# Altium PCB Alarm-Clock-v1.1.PcbDoc (part 4 of 4)
Units mm, origin at the board's own origin, x right, y up, seen from the top; angles counter-clockwise.
Board outline 56 x 73 mm, 2 copper layers (Top Layer, Bottom Layer), stack 1.448 mm thick; 146 components, 110 nets, 466 pads, 352 vias.
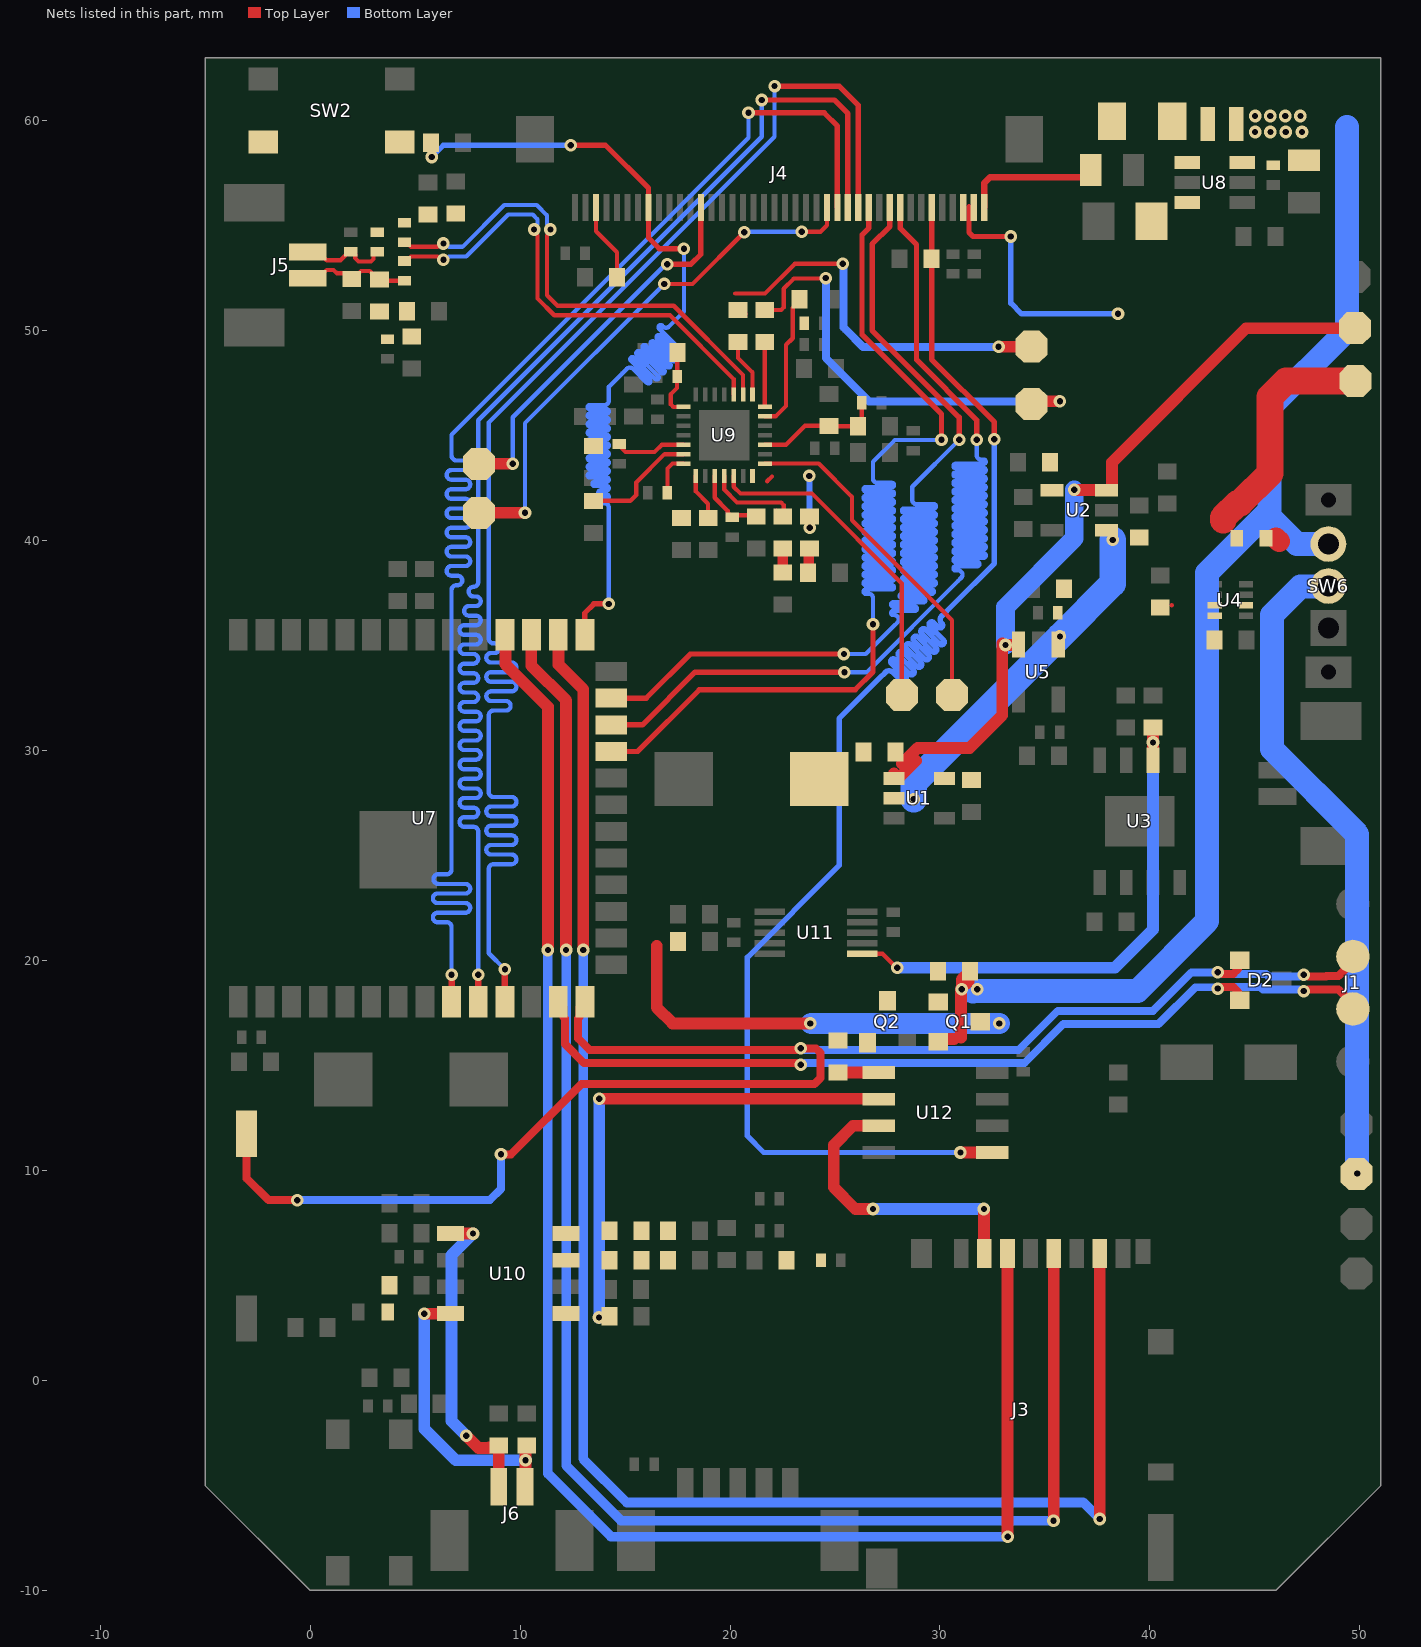
[diagram p3: the nets of this part, all layers, seen from the top]

## Via types
v1: diameter 0.6, hole 0.3, Top Layer to Bottom Layer, tented both sides, 187 vias
v2: diameter 0.6, hole 0.3, Top Layer to Bottom Layer, 165 vias

## Nets (pads, with @x,y where several pads share a name; then routed paths per layer and width w, separated by ;. In a path a pad name is that pad's centre, name@x,y a point inside that pad or via, vN(x,y) a via of type N, cw(c..) or ccw(c..) an arc to the next point about the centre after c; other vN are vias at no path point) (continued)
LCD_DB17: J4.33 R9.2 SW2.1 SW2.2 U7.27 | length 73.4
  Top Layer w0.254: v1(12.421,58.826) 14.072,58.826 16.115,56.783 J4.33@16.115,55.863 16.115,54.421 16.637,53.899 v1(17.805,53.899) ; U7.27@13.089,35.524 13.081,35.532 13.081,36.551 13.513,36.982 v1(14.224,36.982)
  Bottom Layer w0.203: v1(14.224,36.982) 14.224,41.478 14.224,41.58 ccw(c14.021,41.58) 14.021,41.783 13.843,41.783 cw(c13.843,41.885) 13.843,41.986 14.122,41.986 ccw(c14.122,42.088) 14.122,42.189 13.831,42.189 cw(c13.831,42.291) 13.831,42.393 14.122,42.393 ccw(c14.122,42.494) 14.122,42.596 13.552,42.596 cw(c13.552,42.697) 13.552,42.799 14.122,42.799 ccw(c14.122,42.901) 14.122,43.002 13.326,43.002 cw(c13.326,43.104) 13.326,43.205 14.122,43.205 ccw(c14.122,43.307) 14.122,43.409 13.326,43.409 cw(c13.326,43.51) 13.326,43.612 14.122,43.612 ccw(c14.122,43.713) 14.122,43.815 13.326,43.815 cw(c13.326,43.917) 13.326,44.018 14.122,44.018 ccw(c14.122,44.12) 14.122,44.221 13.326,44.221 cw(c13.326,44.323) 13.326,44.425 14.122,44.425 ccw(c14.122,44.526) 14.122,44.628 13.326,44.628 cw(c13.326,44.729) 13.326,44.831 14.122,44.831 ccw(c14.122,44.933) 14.122,45.034 13.326,45.034 cw(c13.326,45.136) 13.326,45.237 14.122,45.237 ccw(c14.122,45.339) 14.122,45.441 13.326,45.441 cw(c13.326,45.542) 13.326,45.644 14.122,45.644 ccw(c14.122,45.745) 14.122,45.847 13.326,45.847 cw(c13.326,45.949) 13.326,46.05 14.122,46.05 ccw(c14.122,46.152) 14.122,46.253 13.326,46.253 cw(c13.326,46.355) 13.326,46.457 14.021,46.457 ccw(c14.021,46.66) 14.224,46.66 14.224,47.066 14.224,47.32 14.872,47.968 15.087,48.183 cw(c15.231,48.04) 15.374,48.184 16.038,47.52 ; 16.039,47.519 ccw(c16.111,47.591) 16.183,47.519 ccw(c16.111,47.591) 16.183,47.663 15.282,48.564 cw(c15.354,48.635) 15.282,48.707 cw(c15.354,48.635) 15.426,48.707 16.431,47.701 ccw(c16.503,47.773) 16.575,47.701 ccw(c16.503,47.773) 16.575,47.845 15.569,48.851 cw(c15.641,48.923) 15.569,48.995 cw(c15.641,48.923) 15.713,48.995 16.719,47.989 ccw(c16.791,48.061) 16.862,47.989 ccw(c16.791,48.061) 16.862,48.132 15.857,49.138 cw(c15.928,49.21) 15.857,49.282 cw(c15.928,49.21) 16,49.282 17.006,48.276 ccw(c17.078,48.348) 17.15,48.276 ccw(c17.078,48.348) 17.15,48.42 16.248,49.321 ; 16.248,49.321 cw(c16.32,49.393) 16.248,49.465 cw(c16.32,49.393) 16.392,49.465 17.293,48.563 ccw(c17.365,48.635) 17.437,48.563 ccw(c17.365,48.635) 17.437,48.707 16.536,49.609 cw(c16.608,49.68) 16.536,49.752 cw(c16.608,49.68) 16.679,49.752 17.581,48.851 ccw(c17.653,48.923) 17.725,48.851 ccw(c17.653,48.923) 17.725,48.995 16.628,50.091 cw(c16.7,50.163) 16.628,50.235 cw(c16.7,50.163) 16.772,50.235 16.811,50.195 ccw(c16.955,50.339) 17.099,50.195 17.386,50.482 17.805,50.902 v1(17.805,53.899)
  Bottom Layer w0.254: v1(5.791,58.268) 6.35,58.826 v1(12.421,58.826)
LCD_DE: J4.13 U7.11 | length 76
  Top Layer w0.254: v1(22.123,61.646) 25.197,61.646 26.115,60.728 J4.13@26.115,55.863
  Top Layer w0.305: U7.11@9.279,18.024 v1(9.279,19.576)
  Bottom Layer w0.203: v1(9.279,19.576) 8.509,20.345 8.509,23.8 8.509,24.359 cw(c8.738,24.359) 8.738,24.587 9.599,24.587 ccw(c9.599,24.816) 9.599,25.044 8.618,25.044 cw(c8.618,25.273) 8.618,25.502 9.599,25.502 ccw(c9.599,25.73) 9.599,25.959 8.618,25.959 cw(c8.618,26.187) 8.618,26.416 9.599,26.416 ccw(c9.599,26.645) 9.599,26.873 8.618,26.873 cw(c8.618,27.102) 8.618,27.33 9.599,27.33 ccw(c9.599,27.559) 9.599,27.788 8.738,27.788 cw(c8.738,28.016) 8.509,28.016 8.509,31.674 cw(c8.738,31.674) 8.738,31.902 9.321,31.902 ccw(c9.321,32.131) 9.321,32.36 8.618,32.36 cw(c8.618,32.588) 8.618,32.817 9.599,32.817 ccw(c9.599,33.045) 9.599,33.274 8.618,33.274 cw(c8.618,33.503) 8.618,33.731 9.599,33.731 ccw(c9.599,33.96) 9.599,34.188 8.618,34.188 cw(c8.618,34.417) 8.618,34.646 8.787,34.646 ccw(c8.787,34.874) 8.787,35.103 8.738,35.103 cw(c8.738,35.331) 8.509,35.331 8.509,45.618 22.123,59.233 v1(22.123,61.646)
LCD_HSYNC: J4.15 U7.9 | length 76
  Top Layer w0.254: v1(20.879,60.376) 24.486,60.376 25.115,59.746 J4.15@25.115,55.863
  Top Layer w0.305: U7.9@6.739,18.024 v1(6.739,19.32)
  Bottom Layer w0.203: v1(6.739,19.32) 6.739,21.488 6.739,21.59 ccw(c6.51,21.59) 6.51,21.819 6.078,21.819 cw(c6.078,22.047) 6.078,22.276 7.399,22.276 ccw(c7.399,22.504) 7.399,22.733 6.078,22.733 cw(c6.078,22.962) 6.078,23.19 7.399,23.19 ccw(c7.399,23.419) 7.399,23.647 6.105,23.647 cw(c6.105,23.876) 6.105,24.105 6.51,24.105 ccw(c6.51,24.333) 6.739,24.333 6.739,25.451 6.739,37.084 6.739,37.643 cw(c6.967,37.643) 6.967,37.871 7.019,37.871 ccw(c7.019,38.1) 7.019,38.329 6.731,38.329 cw(c6.731,38.557) 6.731,38.786 7.399,38.786 ccw(c7.399,39.014) 7.399,39.243 6.731,39.243 cw(c6.731,39.472) 6.731,39.7 7.399,39.7 ccw(c7.399,39.929) 7.399,40.157 6.731,40.157 cw(c6.731,40.386) 6.731,40.615 7.399,40.615 ccw(c7.399,40.843) 7.399,41.072 6.731,41.072 cw(c6.731,41.3) 6.731,41.529 7.399,41.529 ccw(c7.399,41.758) 7.399,41.986 6.731,41.986 cw(c6.731,42.215) 6.731,42.443 7.399,42.443 ccw(c7.399,42.672) 7.399,42.901 6.731,42.901 cw(c6.731,43.129) 6.731,43.358 7.399,43.358 ccw(c7.399,43.586) 7.399,43.815 6.967,43.815 cw(c6.967,44.044) 6.739,44.044 6.739,44.755 6.739,45.042 20.879,59.182 v1(20.879,60.376)
LCD_PCLK: J4.12 U7.23 | length 75.6
  Top Layer w0.254: U7.23@14.339,29.954 15.603,29.954 18.542,32.893 25.959,32.893 26.81,33.744 v1(26.81,36.017) ; J4.12@26.615,55.863 26.615,54.885 26.289,54.559 26.289,49.809 30.074,46.025 v1(30.074,44.794)
  Bottom Layer w0.203: v1(26.81,36.017) 26.81,37.16 26.81,37.262 ccw(c26.607,37.262) 26.607,37.465 26.467,37.465 cw(c26.467,37.567) 26.467,37.668 27.708,37.668 ccw(c27.708,37.77) 27.708,37.871 26.467,37.871 cw(c26.467,37.973) 26.467,38.075 27.708,38.075 ccw(c27.708,38.176) 27.708,38.278 26.467,38.278 cw(c26.467,38.379) 26.467,38.481 27.708,38.481 ccw(c27.708,38.583) 27.708,38.684 26.467,38.684 cw(c26.467,38.786) 26.467,38.887 27.708,38.887 ccw(c27.708,38.989) 27.708,39.091 26.467,39.091 cw(c26.467,39.192) 26.467,39.294 27.708,39.294 ccw(c27.708,39.395) 27.708,39.497 26.467,39.497 cw(c26.467,39.599) 26.467,39.7 27.708,39.7 ccw(c27.708,39.802) 27.708,39.903 26.467,39.903 cw(c26.467,40.005) 26.467,40.107 27.708,40.107 ccw(c27.708,40.208) 27.708,40.31 26.467,40.31 cw(c26.467,40.411) 26.467,40.513 27.708,40.513 ccw(c27.708,40.615) 27.708,40.716 26.467,40.716 cw(c26.467,40.818) 26.467,40.919 27.708,40.919 ccw(c27.708,41.021) 27.708,41.123 26.467,41.123 cw(c26.467,41.224) 26.467,41.326 27.708,41.326 ccw(c27.708,41.427) 27.708,41.529 26.467,41.529 cw(c26.467,41.631) 26.467,41.732 27.708,41.732 ccw(c27.708,41.834) 27.708,41.935 26.467,41.935 cw(c26.467,42.037) 26.467,42.139 27.708,42.139 ccw(c27.708,42.24) 27.708,42.342 26.467,42.342 cw(c26.467,42.443) 26.467,42.545 27.708,42.545 ccw(c27.708,42.647) 27.708,42.748 27.013,42.748 cw(c27.013,42.951) 26.81,42.951 26.81,43.332 26.81,43.752 27.852,44.794 v1(30.074,44.794)
LCD_RST: J4.6 R15.1 U12.5 | length 76
  Top Layer w0.254: J4.6@29.615,55.863 29.615,53.435 R15.1@29.604,53.424 29.604,48.628 32.588,45.644 v1(32.588,44.831)
  Top Layer w0.559: v1(30.976,10.854) U12.5@32.482,10.854
  Bottom Layer w0.254: v1(30.976,10.854) 21.608,10.854 20.823,11.638 20.823,20.147 25.197,24.521 25.197,31.521 27.127,33.452 27.397,33.721 cw(c27.576,33.542) 27.755,33.722 28.194,33.284 ccw(c28.283,33.373) 28.373,33.284 ccw(c28.283,33.373) 28.373,33.463 27.688,34.148 cw(c27.778,34.238) 27.688,34.327 cw(c27.778,34.238) 27.868,34.327 28.553,33.643 ccw(c28.643,33.733) 28.732,33.643 ccw(c28.643,33.733) 28.732,33.822 28.048,34.507 cw(c28.138,34.597) 28.048,34.687 cw(c28.138,34.597) 28.227,34.687 28.912,34.002 ccw(c29.002,34.092) 29.092,34.002 ccw(c29.002,34.092) 29.092,34.182 28.407,34.866 cw(c28.497,34.956) 28.407,35.046 cw(c28.497,34.956) 28.587,35.046 29.271,34.361 ccw(c29.361,34.451) 29.451,34.361 ccw(c29.361,34.451) 29.451,34.541 28.766,35.225 cw(c28.856,35.315) 28.766,35.405 cw(c28.856,35.315) 28.946,35.405 29.63,34.72 ccw(c29.72,34.81) 29.81,34.72 ccw(c29.72,34.81) 29.81,34.9 29.125,35.585 cw(c29.215,35.674) 29.125,35.764 cw(c29.215,35.674) 29.305,35.764 29.99,35.08 ccw(c30.079,35.169) 30.169,35.08 ccw(c30.079,35.169) 30.169,35.259 29.518,35.911 cw(c29.607,36.001) 29.518,36.09 cw(c29.607,36.001) 29.697,36.09 29.911,35.876 ccw(c30.001,35.966) 30.091,35.876 ccw(c30.001,35.966) 30.091,36.056 cw(c30.27,36.236) 30.091,36.415 30.594,36.919 32.588,38.913 v1(32.588,44.831)
LCD_SCK: J4.10 U7.25 | length 76.1
  Top Layer w0.254: U7.25@14.339,32.494 16.01,32.494 18.11,34.595 v1(25.425,34.595) ; J4.10@27.615,55.863 27.615,54.96 26.772,54.117 26.772,50.009 30.912,45.869 v1(30.912,44.794)
  Bottom Layer w0.203: v1(25.425,34.595) 26.467,34.595 27.813,35.941 27.974,36.102 ccw(c27.83,36.246) 27.83,36.449 27.778,36.449 cw(c27.778,36.551) 27.778,36.652 28.798,36.652 ccw(c28.798,36.754) 28.798,36.855 27.778,36.855 cw(c27.778,36.957) 27.778,37.059 29.205,37.059 ccw(c29.205,37.16) 29.205,37.262 28.187,37.262 cw(c28.187,37.363) 28.187,37.465 29.611,37.465 ccw(c29.611,37.567) 29.611,37.668 28.292,37.668 cw(c28.292,37.77) 28.292,37.871 29.705,37.871 ccw(c29.705,37.973) 29.705,38.075 28.292,38.075 cw(c28.292,38.176) 28.292,38.278 29.705,38.278 ccw(c29.705,38.379) 29.705,38.481 28.292,38.481 cw(c28.292,38.583) 28.292,38.684 29.705,38.684 ccw(c29.705,38.786) 29.705,38.887 28.292,38.887 cw(c28.292,38.989) 28.292,39.091 29.705,39.091 ccw(c29.705,39.192) 29.705,39.294 28.292,39.294 cw(c28.292,39.395) 28.292,39.497 29.705,39.497 ccw(c29.705,39.599) 29.705,39.7 28.292,39.7 cw(c28.292,39.802) 28.292,39.903 29.705,39.903 ccw(c29.705,40.005) 29.705,40.107 28.292,40.107 cw(c28.292,40.208) 28.292,40.31 29.705,40.31 ccw(c29.705,40.411) 29.705,40.513 28.292,40.513 cw(c28.292,40.615) 28.292,40.716 29.705,40.716 ccw(c29.705,40.818) 29.705,40.919 28.292,40.919 cw(c28.292,41.021) 28.292,41.123 29.705,41.123 ccw(c29.705,41.224) 29.705,41.326 28.292,41.326 cw(c28.292,41.427) 28.292,41.529 29.705,41.529 ccw(c29.705,41.631) 29.705,41.732 28.88,41.732 cw(c28.88,41.935) 28.677,41.935 28.677,42.291 28.677,42.559 v1(30.912,44.794)
LCD_SDA: J4.9 U7.24 | length 75
  Top Layer w0.254: U7.24@14.339,31.224 15.832,31.224 18.339,33.731 v1(25.451,33.731) ; J4.9@28.115,55.863 28.115,54.867 28.88,54.102 28.88,48.616 31.75,45.745 v1(31.75,44.794)
  Bottom Layer w0.203: v1(25.451,33.731) 26.518,33.731 30.853,38.067 31.014,38.228 ccw(c30.87,38.371) 30.87,38.575 30.746,38.575 cw(c30.746,38.676) 30.746,38.778 31.777,38.778 ccw(c31.777,38.879) 31.777,38.981 30.746,38.981 cw(c30.746,39.083) 30.746,39.184 32.08,39.184 ccw(c32.08,39.286) 32.08,39.387 30.746,39.387 cw(c30.746,39.489) 30.746,39.591 32.08,39.591 ccw(c32.08,39.692) 32.08,39.794 30.746,39.794 cw(c30.746,39.895) 30.746,39.997 32.08,39.997 ccw(c32.08,40.099) 32.08,40.2 30.746,40.2 cw(c30.746,40.302) 30.746,40.403 32.08,40.403 ccw(c32.08,40.505) 32.08,40.607 30.746,40.607 cw(c30.746,40.708) 30.746,40.81 32.08,40.81 ccw(c32.08,40.911) 32.08,41.013 30.746,41.013 cw(c30.746,41.115) 30.746,41.216 32.08,41.216 ccw(c32.08,41.318) 32.08,41.419 30.746,41.419 cw(c30.746,41.521) 30.746,41.623 32.08,41.623 ccw(c32.08,41.724) 32.08,41.826 30.746,41.826 cw(c30.746,41.927) 30.746,42.029 32.08,42.029 ccw(c32.08,42.131) 32.08,42.232 30.746,42.232 cw(c30.746,42.334) 30.746,42.435 32.08,42.435 ccw(c32.08,42.537) 32.08,42.639 30.746,42.639 cw(c30.746,42.74) 30.746,42.842 32.08,42.842 ccw(c32.08,42.943) 32.08,43.045 30.746,43.045 cw(c30.746,43.147) 30.746,43.248 32.08,43.248 ccw(c32.08,43.35) 32.08,43.451 30.746,43.451 cw(c30.746,43.553) 30.746,43.655 32.08,43.655 ccw(c32.08,43.756) 32.08,43.858 31.953,43.858 cw(c31.953,44.061) 31.75,44.061 31.75,44.398 v1(31.75,44.794)
LCD_VSYNC: J4.14 U7.10 | length 76
  Top Layer w0.203: J4.14@25.609,55.869 J4.14@25.615,55.863
  Top Layer w0.254: v1(21.514,60.985) 24.968,60.985 25.615,60.339 25.615,55.875 J4.14@25.609,55.869
  Top Layer w0.305: U7.10@8.009,18.024 v1(8.009,19.32)
  Bottom Layer w0.203: v1(8.009,19.32) 8.009,26.035 8.009,26.137 ccw(c7.78,26.137) 7.78,26.365 7.348,26.365 cw(c7.348,26.594) 7.348,26.822 7.78,26.822 ccw(c7.78,27.051) 7.78,27.28 7.348,27.28 cw(c7.348,27.508) 7.348,27.737 7.899,27.737 ccw(c7.899,27.965) 7.899,28.194 7.348,28.194 cw(c7.348,28.423) 7.348,28.651 7.899,28.651 ccw(c7.899,28.88) 7.899,29.108 7.348,29.108 cw(c7.348,29.337) 7.348,29.566 7.899,29.566 ccw(c7.899,29.794) 7.899,30.023 7.348,30.023 cw(c7.348,30.251) 7.348,30.48 7.899,30.48 ccw(c7.899,30.709) 7.899,30.937 7.348,30.937 cw(c7.348,31.166) 7.348,31.394 7.899,31.394 ccw(c7.899,31.623) 7.899,31.852 7.348,31.852 cw(c7.348,32.08) 7.348,32.309 7.78,32.309 ccw(c7.78,32.537) 7.78,32.766 7.348,32.766 cw(c7.348,32.995) 7.348,33.223 7.78,33.223 ccw(c7.78,33.452) 7.78,33.68 7.348,33.68 cw(c7.348,33.909) 7.348,34.138 7.78,34.138 ccw(c7.78,34.366) 7.78,34.595 7.348,34.595 cw(c7.348,34.823) 7.348,35.052 7.899,35.052 ccw(c7.899,35.281) 7.899,35.509 7.348,35.509 cw(c7.348,35.738) 7.348,35.966 7.899,35.966 ccw(c7.899,36.195) 7.899,36.424 7.566,36.424 cw(c7.566,36.652) 7.566,36.881 7.899,36.881 ccw(c7.899,37.109) 7.899,37.338 7.78,37.338 cw(c7.78,37.567) 7.78,37.795 ccw(c7.78,38.024) 8.009,38.024 8.009,40.368 8.009,45.728 21.514,59.233 v1(21.514,60.985)
LCK: C29.1 R20.1 U9.7 | length 2.2
  Top Layer w0.203: C29.1@17.018,42.083 17.018,43.429 17.256,43.667 U9.7@17.79,43.667
LEDA: C23.1 D3.1 J4.1 | length 6.5
  Top Layer w0.203: C23.1@36.84,57.302 C23.1@37.188,57.65
  Top Layer w0.305: J4.1@32.115,55.863 32.115,57.032 32.385,57.302 C23.1@36.84,57.302
LEDK: J4.2 J4.3 R16.2 U8.3 | length 12.3
  Top Layer w0.254: 31.382,55.901 31.382,54.673 31.572,54.483 v1(33.376,54.483) ; J4.2@31.615,55.35 J4.2@31.615,55.863
  Bottom Layer w0.254: v1(33.376,54.483) 33.376,51.308 33.884,50.8 v1(38.481,50.8)
MCLK: C27.1 R17.1 U9.1 | length 3.3
  Top Layer w0.203: R17.1@17.488,48.954 C27.1@17.488,47.811 17.48,47.802 17.48,47.269 17.183,46.972 17.183,46.486 17.302,46.367 U9.1@17.79,46.367
MIC_IN_N: C42.1 U9.23 | length 23.2
  Top Layer w0.203: C42.1@4.496,54.204 4.585,54.204 4.801,53.988 6.082,53.988 ; 11.285,54.546 11.285,53.803 11.282,53.799 11.282,51.685 11.786,51.181 17.324,51.181 20.623,47.882 U9.23@20.623,46.95
  Bottom Layer w0.203: v1(6.35,54.148) 6.457,54.148 6.618,53.988 7.252,53.988 9.246,55.982 10.792,55.982 11.285,55.488 11.285,55.081 11.446,54.921 v1(11.446,54.813)
MIC_IN_P: C40.1 U9.24 | length 22.4
  Top Layer w0.203: C40.1@4.496,53.315 4.585,53.315 4.801,53.53 6.082,53.53 ; 10.828,54.546 10.828,53.803 10.832,53.799 10.832,51.525 11.626,50.731 17.138,50.731 20.173,47.695 U9.24@20.173,46.95
  Bottom Layer w0.203: v1(6.35,53.37) 6.457,53.37 6.618,53.53 7.441,53.53 9.435,55.524 10.603,55.524 10.828,55.299 10.828,55.081 10.668,54.921 v1(10.668,54.813)
MIC_N: J5.1 SB4.2 SB5.2 | length 4.2
  Top Layer w0.203: J5.1@-0.109,53.744 0.391,53.744 0.787,53.348 1.443,53.348 1.841,53.746 SB5.2@1.93,53.746 2.019,53.746 2.146,53.619 2.146,53.457 2.31,53.294 2.904,53.294 3.023,53.413 3.023,53.619 3.15,53.746 SB4.2@3.2,53.746
MIC_P: C40.2 C41.2 J5.2 R26.1 | length 5.3
  Top Layer w0.203: J5.2@-0.109,52.494 0.391,52.494 0.787,52.891 1.118,52.891 1.278,52.73 1.702,52.73 C41.2@1.981,52.451 2.045,52.451 2.43,52.836 2.84,52.836 2.959,52.717 2.959,52.705 3.238,52.426 R26.1@3.302,52.426 3.353,52.375 C40.2@4.496,52.375
MIX_IN+: R28.1 U10.3
MIX_IN-: R29.1 U10.4
NetC1_2: C1.2 U1.5
NetC5_2: C5.2 U2.4
NetC30_2: C30.2 C31.2 U9.10 | length 3.4
  Top Layer w0.203: U9.10@19.273,43.084 19.273,42.038 19.888,41.423 19.888,41.334 20.015,41.207 C30.2@21.247,41.207
NetC32_1: C32.1 U9.22 | length 2.8
  Top Layer w0.203: C32.1@20.384,49.462 20.384,48.7 21.073,48.01 U9.22@21.073,46.95
NetC32_2: C32.2 P11.1 | length 18.4
  Top Layer w0.203: 20.244,51.765 21.666,51.765 23.089,53.188 v1(25.375,53.188)
  Top Layer w0.381: C32.2@20.384,50.986 20.442,50.986 C32.2@20.633,50.795
  Top Layer w0.559: v1(32.791,49.225) 32.795,49.229 34.35,49.229 P11.1@34.354,49.233
  Bottom Layer w0.381: v1(25.375,53.188) 25.417,53.146 25.417,50.149 25.502,50.063 26.34,49.225 v1(32.791,49.225)
NetC33_1: C33.1 U9.14 | length 3.4
  Top Layer w0.203: 21.768,42.824 21.996,43.053 ; v1@23.749,43.053 v1(23.774,43.078)
  Top Layer w0.305: v1(23.8,40.615) 23.794,40.621 23.794,41.096 C33.1@23.871,41.173
  Bottom Layer w0.305: v1(23.774,43.078) 23.787,43.066 23.787,40.627 v1(23.8,40.615)
NetC33_2: C33.2 R22.2 | length 1.2
  Top Layer w0.508: R22.2@23.711,38.514 23.749,38.552 23.749,39.645 C33.2@23.787,39.683
NetC34_1: C34.1 U9.11 | length 4.8
  Top Layer w0.203: U9.11@19.723,43.084 19.723,42.43 20.338,41.816 22.436,41.816 22.555,41.697 22.555,41.194 C34.1@22.517,41.156 22.488,41.156 C34.1@22.209,41.435
NetC34_2: C34.2 R23.2 | length 1.1
  Top Layer w0.508: R23.2@22.517,38.54 C34.2@22.517,39.683
NetC35_1: C35.1 U9.21 | length 3.1
  Top Layer w0.203: U9.21@21.656,46.367 21.656,49.363 C35.1@21.755,49.462
NetC35_2: C35.2 P13.1 | length 21.2
  Top Layer w0.203: C35.2@21.654,50.986 22.436,50.986 22.555,51.105 22.555,51.994 23.041,52.48 v1@24.533,52.48
  Top Layer w0.559: P13.1@34.354,46.515 34.473,46.634 v1@35.701,46.634
  Bottom Layer w0.381: v1@24.562,52.451 24.562,48.692 26.619,46.634 v1(35.712,46.634)
  other v1: 24.562,52.502
NetC36_2: C36.2 C37.2 R25.2 R26.2
NetC38_1: C38.1 C39.1 R24.2 U9.17 | length 6
  Top Layer w0.203: U9.17@21.656,44.567 22.672,44.567 23.571,45.466 C38.1@24.714,45.466 24.732,45.448 R24.2@26.099,45.448 26.277,45.626 C39.1@26.277,46.566
NetC42_2: C42.2 C43.2 R27.1 SB4.1
NetC55_2: C55.2 R28.2
NetC56_2: C56.2 R29.2
NetD3_2: D3.2 L1.2 U8.1
NetFB3_2: FB3.2 R30.2
NetJ4_16: J4.16 P8.1 | length 25.6
  Top Layer w0.203: v1(16.866,52.222) 18.212,52.222 v1(20.676,54.686) ; v1(23.419,54.712) 24.308,54.712 24.615,55.019 J4.16@24.615,55.863
  Top Layer w0.559: P8.1@8.057,41.326 v1(10.236,41.326)
  Bottom Layer w0.203: v1(10.236,41.326) 10.236,45.593 v1(16.866,52.222) ; v1(20.676,54.686) 20.701,54.712 v1(23.419,54.712)
NetJ4_28: J4.28 P9.1 | length 18.2
  Top Layer w0.254: v1(17.018,53.162) 18.136,53.162 18.612,53.638 18.612,55.86 J4.28@18.615,55.863
  Top Layer w0.559: P9.1@8.057,43.663 v1(9.652,43.663)
  Bottom Layer w0.203: v1(9.652,43.663) 9.652,45.872 16.942,53.162 v1(17.018,53.162)
NetJ4_38: J4.38 R13.2 | length 3.7
  Top Layer w0.203: J4.38@13.615,55.863 13.615,54.732 14.618,53.729 R13.2@14.618,52.535
NetP10_1: P10.1 U9.12 | length 15.7
  Top Layer w0.203: U9.12@20.173,43.084 20.173,42.565 20.498,42.24 23.901,42.24 28.182,37.96 P10.1@28.182,32.647
NetP12_1: P12.1 U9.15 | length 16.2
  Top Layer w0.203: U9.15@21.656,43.667 24.228,43.667 25.813,42.081 25.813,40.964 30.569,36.207 P12.1@30.569,32.647
NetQ1_1: Q1.1 Q2.3 R33.1
NetQ2_1: Q2.1 R36.1
NetR19_1: R19.1 U9.6 | length 5.6
  Top Layer w0.203: R19.1@13.5,41.892 15.253,41.892 15.532,42.172 15.532,42.761 16.888,44.117 U9.6@17.79,44.117
NetR21_1: R21.1 U9.8 | length 2.2
  Top Layer w0.203: U9.8@18.373,43.084 18.373,42.333 18.953,41.753 18.953,41.359 18.834,41.359 R21.1@18.726,41.251
NetR32_2: R32.2 SB1.2
OUTN: C51.1 J6.1 U10.5 | length 15.2
  Top Layer w0.559: U10.5@6.763,6.993 v1(7.76,6.993) ; v1(7.442,-2.642) 8.024,-3.223 8.487,-3.223 8.517,-3.193 8.878,-3.193 C51.1@8.979,-3.091 8.984,-3.096 8.984,-5.062 J6.1@8.989,-5.067
  Bottom Layer w0.559: v1(7.442,-2.642) 6.731,-1.93 6.731,5.964 v1(7.76,6.993)
OUTP: C50.1 J6.2 U10.8 | length 14.4
  Top Layer w0.559: v1(5.436,3.175) U10.8@6.679,3.175 ; J6.2@10.239,-5.067 J6.2@10.282,-5.024 ; J6.2@10.257,-5.024 C50.1@10.257,-3.193 ; J6.2@10.271,-4.966 J6.2@10.271,-4.837 ; C50.1@10.282,-3.193 10.271,-3.193 10.373,-3.091 C50.1@10.427,-3.091
  Bottom Layer w0.559: v1(5.436,3.175) 5.436,-2.311 6.934,-3.81 v1(10.262,-3.81)
PA_EN: R31.2 U10.1 U12.2 | length 23.7
  Top Layer w0.559: v1(13.767,13.411) U12.2@27.064,13.411
  Bottom Layer w0.559: v1@13.767,2.992 v1(13.762,2.997) 13.762,3.017 13.767,3.021 v1(13.767,13.411)
PWR_EN: P7.1 R1.1 U1.1 U2.3 U5.3 | length 37.7
  Top Layer w0.559: U1.1@27.809,28.669 U1.1@27.809,28.69 ; U1.1@27.809,28.901 U1.1@27.809,28.69 ; 28.182,29.37 28.936,30.124 31.42,30.124 32.969,31.674 v1@32.969,35.103 ; 28.854,29.515 28.03,28.69 U1.1@27.809,28.69 ; v1(33.122,35.027) 33.712,35.027 U5.3@33.734,35.049 ; v1(36.398,42.418) 36.406,42.41 U2.3@37.92,42.41 ; U2.3@38.181,42.399 U2.3@37.931,42.399 38.177,42.399 38.198,42.42 38.198,43.735 44.577,50.114 P7.1@49.759,50.114
  Bottom Layer w0.889: v1(33.122,35.027) 33.122,36.83 36.398,40.107 v1(36.398,42.418)
SD_CS: J3.2 U12.3 | length 14.2
  Top Layer w0.559: v1(26.81,8.161) 25.976,8.161 24.943,9.195 24.943,11.208 25.858,12.123 U12.3@27.082,12.124 U12.3@27.082,12.124 ; J3.2@32.091,6.042 32.092,6.043 32.092,8.084 v1@32.093,8.085
  Bottom Layer w0.559: v1(26.81,8.161) v1(32.093,8.161)
SDMMC_CLK: J3.5 U7.29 | length 77.3
  Top Layer w0.559: U7.29@10.536,35.512 10.536,34.041 12.192,32.385 v1(12.192,20.498) ; v1@35.416,-6.671 35.415,-6.67 35.415,-6.661 35.416,-6.66 J3.5@35.416,6.042
  Bottom Layer w0.457: v1(12.192,20.498) 12.192,-4.064 14.808,-6.68 v1(35.408,-6.68)
SDMMC_CMD: J3.3 U7.30 | length 77.4
  Top Layer w0.559: U7.30@9.266,35.512 9.304,35.475 9.304,34.104 11.328,32.08 v1(11.328,20.498) ; J3.3@33.216,6.042 33.22,6.038 33.22,-7.439 v1(33.223,-7.442)
  Bottom Layer w0.457: v1(11.328,20.498) 11.328,-4.445 14.326,-7.442 v1(33.223,-7.442)
SDMMC_D0: J3.7 U7.28 | length 78.2
  Top Layer w0.559: U7.28@11.836,35.507 11.836,34.087 13.005,32.918 v1(13.005,20.498) ; v1@37.616,-6.604 J3.7@37.616,6.042
  Bottom Layer w0.457: v1(13.005,20.498) 13.005,-3.738 15.083,-5.817 36.83,-5.817 v1(37.617,-6.604)
SLK: C28.1 R18.1 U9.5 | length 3.4
  Top Layer w0.203: C28.1@14.72,44.598 14.72,44.526 15.024,44.221 16.408,44.221 16.754,44.567 U9.5@17.79,44.567
ST_LM: R8.1 U4.8
STDBY: R6.1 U3.6 U11.6 | length 25.3
  Top Layer w0.203: U11.6@26.292,20.318 27.264,20.318 27.915,19.668 v1@27.96,19.668
  Top Layer w0.559: U3.6@40.145,29.536 v1(40.145,30.386) R6.1@40.145,31.072
  Bottom Layer w0.559: v1(27.96,19.66) 38.334,19.66 40.145,21.471 v1(40.145,30.386)
USB_D_N: D2.2 J1.2 U7.13 | length 43.9
  Top Layer w0.381: U7.13@11.819,18.024 12.078,17.765 12.078,17.3 12.136,17.242 12.136,16.018 13.046,15.108 23.142,15.108 23.171,15.079 23.326,15.079 v1(23.368,15.037) ; v1(43.231,18.661) 43.273,18.703 43.428,18.703 43.457,18.732 43.973,18.732 44.196,18.509 44.196,18.32 44.416,18.1 D2.2@44.466,18.1 ; v1(47.32,18.542) 47.362,18.584 47.517,18.584 47.546,18.613 48.654,18.613 48.663,18.623 48.979,18.623 49.67,17.931 J1.2@49.67,17.69
  Bottom Layer w0.381: v1(23.368,15.037) 23.41,15.079 23.565,15.079 23.594,15.108 34.015,15.108 35.874,16.967 40.411,16.967 42.169,18.725 43.108,18.725 43.172,18.661 v1(43.231,18.661) 43.273,18.703 43.428,18.703 43.457,18.732 45.27,18.732 45.39,18.613 47.094,18.613 47.123,18.584 47.278,18.584 v1(47.32,18.542)
USB_D_P: D2.1 J1.3 SW3.1 U7.14 | length 78.4
  Top Layer w0.381: SW3.1@-3.023,11.746 -3.023,9.627 -1.981,8.585 v1(-0.61,8.585) ; v1(9.093,10.77) 9.576,10.77 12.929,14.122 24.028,14.122 24.308,14.402 24.308,15.591 24.085,15.815 v1(23.368,15.815) 23.326,15.773 23.171,15.773 23.142,15.743 13.309,15.743 12.771,16.281 12.771,17.242 12.829,17.3 12.829,17.765 U7.14@13.089,18.024 ; v1(43.231,19.439) 43.273,19.397 43.428,19.397 43.457,19.367 43.973,19.367 44.196,19.591 44.196,19.78 44.416,20 D2.1@44.466,20 ; v1(47.32,19.32) 47.362,19.278 47.517,19.278 47.546,19.248 48.391,19.248 48.4,19.258 48.979,19.258 49.67,19.949 J1.3@49.67,20.19
  Bottom Layer w0.381: v1(-0.61,8.585) 8.56,8.585 9.093,9.119 v1(9.093,10.77) ; v1(23.368,15.815) 23.41,15.773 23.565,15.773 23.594,15.743 33.752,15.743 35.611,17.602 40.148,17.602 41.985,19.439 v1(43.231,19.439) 43.273,19.397 43.428,19.397 43.457,19.367 45.533,19.367 45.653,19.248 47.094,19.248 47.123,19.278 47.278,19.278 v1(47.32,19.32)
V_MON: Q1.3 R34.2 | length 19.8
  Top Layer w0.559: 16.51,20.698 16.51,17.755 17.264,17 v1(23.825,17) ; R34.2@17.424,20.739 17.526,20.841 R34.2@17.526,20.904
  Bottom Layer w0.559: v1@23.839,16.981 23.844,16.975 v1@23.87,17
  Bottom Layer w1.016: v1@23.87,17 v1(32.83,17)
V_SYS: C12.1 P3.1 SW6.2 U4.2 U4.7 | length 31.7
  Top Layer w0.203: 41.034,36.914 41.038,36.918 ; P3.1@49.764,9.876 49.789,9.85 P3.1@49.809,9.83
  Top Layer w0.889: P3.1@49.764,9.85 49.789,9.85 P3.1@49.822,9.85
  Bottom Layer w1.143: SW6.2@48.502,37.835 48.484,37.817 47.179,37.817 45.81,36.449 45.81,30.074 49.873,26.011 v2(49.873,9.85)
V_SYS#: C18.1 C19.1 FB1.2 L1.1 Q1.2 R33.2 SW6.3 U8.6 | length 61.8
  Top Layer w0.559: Q1.2@29.925,16.127 30.055,16.257 30.674,16.257 ; 31.001,16.315 31.001,18.641 31.363,19.003 ; v2(31.039,18.626) 31.039,19.096 R33.2@31.433,19.49
  Top Layer w1.016: 46.005,40.114 46.154,39.966 ; SW6.3@48.371,39.966 SW6.3@48.502,39.835
  Bottom Layer w1.143: v2@31.566,18.517 31.599,18.55 39.403,18.55 42.723,21.869 42.723,38.456 45.695,41.427 ; SW6.3@48.502,39.835 47.008,39.835 45.695,41.148 45.695,41.427 ; 49.378,59.69 49.378,50.013 45.695,46.33 45.695,41.427
  other v2: 31.776,18.626 45.009,59.461 45.739,59.461 46.469,59.461 47.244,59.461 45.009,60.223 45.728,60.223 46.448,60.223 47.168,60.223
V_SYS##: C2.1 C4.1 C8.1 C9.1 FB1.1 P4.1 R1.2 U1.2 U2.1 U5.1 | length 27.5
  Top Layer w0.203: v1(28.753,27.686) v1@28.778,27.686
  Top Layer w1.27: 43.491,40.974 43.491,41.091 44.184,41.783 44.3,41.783 45.72,43.203 45.72,46.838 46.482,47.6 P4.1@49.784,47.6
  Bottom Layer w1.27: v1(28.753,27.686) 28.753,28.473 v1(35.712,35.433) 38.227,37.948 v2(38.227,40.03)
VMID: C48.1 C49.1 U9.20 | length 6.3
  Top Layer w0.203: U9.20@21.656,45.917 22.173,45.917 22.67,46.414 22.67,49.322 22.987,49.639 22.987,51.074 C48.1@23.025,51.113 ; C48.1@23.305,51.519 C48.1@23.305,51.748
VMON_EN: R36.2 U12.1 | length 1.8
  Top Layer w0.559: R36.2@25.273,14.664 U12.1@27.082,14.664
pads on no net: J3.1 J3.8 J3.SW-A J3.SW-B J4.7 J4.8 J4.35 J4.36 J4.37 SW6.1 SW6.MH1 SW6.MH2 U1.4 U5.4 U8.5 U9.9 U9.25 U11.2

## Polygon pours and split planes (outlines as drawn)
GND on Top Layer "NONET_L-01_P-001" (solid, remove dead copper, pour order 2): -2.819,60.376 48.235,60.376 48.235,-4.707 45.314,-7.628 0.152,-7.628 -2.819,-4.656
GND on Bottom Layer "NONET_L-01_P-001" (solid, remove dead copper, pour order 1): -2.819,60.376 48.235,60.376 48.235,-4.707 45.314,-7.628 0.152,-7.628 -2.819,-4.656

## Other copper
Top Layer:
  region net GND: 46.863,30.412 46.863,36.576 45.907,36.576 45.907,30.412
  rectangle net GND: 44.221,36.068 46.685,36.576
  rectangle net 5V: 41.173,37.313 42.215,38.1
  rectangle net BATT: 45.187,37.287 46.126,38.71
  rectangle net 3.3V##: 23.698,43.967 24.447,44.729
  rectangle net AGND: 28.397,41.656 34.442,44.171
  rectangle net NetC32_2: 19.863,50.495 21.006,51.892
  rectangle net VMID: 22.885,49.893 23.876,51.925
  rectangle net AGND: 28.397,43.967 29.235,44.602
  rectangle net CODEC_3V3: 27.229,40.005 37.033,41.072
  rectangle net NetC38_1: 24.181,44.983 26.518,45.949
  rectangle net NetC38_1: 25.781,44.983 26.518,46.939
  rectangle net V_SYS#: 30.671,17.983 32.131,20.023
  rectangle net AGND: 38.862,41.504 40.018,42.951
  region net AGND: 15.405,46.507 15.405,49.45 13.738,49.45 13.738,46.507
  rectangle net AGND: 19.761,39.192 21.692,40.437
  region net BATT: 50.724,11.227 50.724,13.023 48.108,13.023 48.108,11.227
  region net LEDK: 40.462,50.317 40.462,51.224 38.075,51.224 38.075,50.317
  rectangle net GND: 34.9,11.836 39.014,13.525
  rectangle net 5V: 40.335,6.807 43.231,14.453
  rectangle net GND: 45.187,18.593 46.787,21.819
  region net 5V#: 47.536,17.094 43.917,17.094 43.917,15.748 47.536,15.748
  rectangle net V_SYS#: 45.212,38.964 49.645,40.742
  rectangle net 3.3V: 6.375,57.887 8.788,59.512
  rectangle net LCD_DB17: -3.175,57.887 6.147,59.512
  rectangle net GND: 0.102,-9.906 3.15,-1.803
  rectangle net GND: 2.032,-3.251 3.15,0.635
  rectangle net EN_: 3.378,-9.83 5.156,0.711
  rectangle net 5V#: 43.917,12.548 47.574,13.894
  rectangle net PWR_EN: 32.69,33.401 34.087,35.712
  rectangle net 5V: 36.982,28.804 38.1,31.445
  rectangle net GND: 10.795,62.306 36.017,62.814
  rectangle net GND: -3.251,60.985 11.557,62.814
  rectangle net GND: 9.754,58.014 11.76,62.789
  rectangle net NetC33_1: 20.93,42.52 24.105,43.358
  rectangle net NetC33_1: 20.93,42.52 21.291,43.358
  rectangle net AGND: 24.74,43.688 26.492,44.729
  rectangle net NetC33_1: 23.343,40.259 24.232,41.478
  rectangle net LEDK: 39.169,50.521 40.462,54.813
  rectangle net GND: 42.418,37.766 44.907,38.608
  rectangle net GND: 40.691,38.438 44.907,39.446
  rectangle net GND: 33.947,38.438 41.034,39.446
  rectangle net GND: 37.287,37.948 40.996,38.837
  rectangle net V_SYS##: 42.164,39.624 44.819,42.418
  rectangle net V_MON: 16.231,20.168 18.059,21.438
  rectangle net AGND: 2.134,56.591 7.366,57.683
  rectangle net AGND: -4.14,54.432 2.388,57.683
  rectangle net AGND: -1.397,48.463 2.489,51.41
  rectangle net NetC42_2: 2.743,54.458 3.607,56.261
  rectangle net NetC42_2: 3.454,54.864 7.366,56.261
  rectangle net NetC36_2: 2.743,49.251 5.334,51.41
  rectangle net AGND: -4.14,47.523 5.372,49.022
  rectangle net 3.3V: 7.841,52.222 8.788,59.512
  rectangle net 3.3V: 5.766,45.623 8.788,52.527
  rectangle net NetC30_2: 19.761,40.742 21.692,41.529
  rectangle net 3.3V: 27.102,52.781 28.499,54
  rectangle net AGND: -4.14,47.523 -1.219,57.201
  rectangle net AGND: 21.926,6.528 24.13,7.595
  rectangle net GND: 30.353,57.836 36.017,62.687
  rectangle net GND: 35.763,51.511 38.659,56.413
  region net CODEC_3V3: 27.229,45.923 27.229,40.005 28.067,40.005 28.067,45.923
  rectangle net CODEC_3V3: 27.28,44.983 29.058,45.923
  rectangle net GND: 14.529,-8.941 21.971,-6.909
  region net GND: 26.187,-3.632 21.209,-3.632 21.209,-8.636 26.187,-8.636
  rectangle net BUT_IN: 16.104,-4.318 16.662,-3.734
  rectangle net BUT: 15.164,-4.318 15.723,-3.734
  rectangle net 5V: 17.399,-6.096 19.533,-3.632
  rectangle net BUT_IN: 19.736,-6.096 20.93,-3.632
  rectangle net AGND: 7.684,-1.948 13.259,0.813
  rectangle net AGND: 24.206,46.482 25.603,52.019
  rectangle net GND: 19.8,21.522 20.943,24.155
  rectangle net GND: 16.231,21.692 18.059,23.698
  rectangle net AGND: 38.913,41.732 41.453,42.316
  rectangle net AGND: 37.351,41.148 41.453,41.859
  rectangle net AGND: 33.249,41.656 34.442,44.171
  rectangle net NetC5_2: 34.722,42.062 35.916,44.221
  rectangle net LCD_BL_EN: 43.764,53.873 45.113,56.533
  rectangle net GND: 45.341,53.67 48.186,57.218
  rectangle net GND: 38.686,56.66 39.829,58.615
  rectangle net GND: 38.94,56.66 43.182,57.422
  rectangle net LEDK: 39.169,54.272 42.416,56.482
  rectangle net BUT_IN: -3.708,1.854 -0.127,4.293
  rectangle net AGND: 15.837,40.699 16.472,42.604
  rectangle net AGND: 14.364,42.756 15.126,43.924
  rectangle net 3.3V: 3.62,45.347 13.31,47.193
  rectangle net 3.3V: 3.48,38.159 6.045,47.193
  rectangle net I2C_PORT.SCL: 3.721,34.704 4.712,37.6
  rectangle net I2C_PORT.SDA: 4.991,34.704 5.982,37.6
  rectangle net GND: 5.563,12.497 10.338,16.637
  rectangle net GND: 20.384,23.343 28.613,27.084
  rectangle net GND: 16.231,23.343 20.968,30.023
  rectangle net GND: 33.617,15.362 34.684,15.921
  rectangle net GND: 38.633,-9.949 41.263,-5.25
  rectangle net GND: 14.529,-9.931 41.25,-8.008
  rectangle net AGND: 5.74,-9.855 13.487,-6.655
  rectangle net GND: -4.229,14.689 -2.908,36.373
  rectangle net 3.3V: -2.654,14.689 -1.638,18.956
  rectangle net AGND: 15.329,3.767 24.168,4.808
  rectangle net AGND: 3.404,5.24 4.737,9.83
  rectangle net 3.3V: 0.292,1.905 2.845,10.727
  rectangle net 3.3V: -2.21,10.041 3.15,16.721
  rectangle net 3.3V: 33.897,5.266 34.709,14.994
  rectangle net NetFB3_2: 3.163,2.802 4.229,4.986
  rectangle net 3.3V#: 4.941,5.088 7.455,6.358
  rectangle net 3.3V#: 4.928,4.039 5.766,8.865
  rectangle net NetR32_2: 21.926,5.062 24.587,6.231
  rectangle net MIX_IN-: 11.506,6.637 14.713,7.628
  rectangle net MIX_IN+: 11.506,5.215 14.745,6.205
  rectangle net PA_EN: 11.506,2.548 14.745,3.538
  rectangle net BYP: 11.506,3.818 14.745,4.808
  rectangle net AGND: 15.329,2.548 16.396,4.808
  rectangle net NetC55_2: 15.38,5.215 17.539,6.205
  rectangle net NetC56_2: 15.38,6.612 17.514,7.755
  rectangle net IN+#: 18.136,5.062 21.654,6.231
  rectangle net IN-#: 18.136,6.612 21.717,9.152
  rectangle net NetQ2_1: 24.714,15.451 26.988,16.619
  rectangle net GND: 26.162,9.863 29.426,11.336
  rectangle net GND: 27.381,4.14 29.782,11.336
  rectangle net 5V: 40.755,16.281 41.948,24.417
  rectangle net 3.3V: 31.458,14.308 34.405,14.994
  rectangle net V_MON: 31.458,15.172 33.16,17.508
  rectangle net V_SYS#: 29.401,15.705 31.28,16.746
  rectangle net BAT_ADC: 18.657,20.455 20.536,21.133
  rectangle net BAT_ADC: 18.657,20.455 19.444,22.69
  rectangle net NetQ1_1: 26.759,17.585 30.417,18.651
  rectangle net NetQ1_1: 29.401,17.585 30.417,20.074
  rectangle net GND: 27.216,25.179 28.563,27.084
  rectangle net GND: 27.216,21.953 37.948,26.017
  rectangle net GND: 30.946,25.179 33.592,27.643
  rectangle net PWR_EN: 27.14,28.329 29.223,30.412
  rectangle net V_SYS##: 22.619,27.262 26.937,30.412
  rectangle net V_SYS##: 22.619,27.262 29.21,28.151
  rectangle net NetC1_2: 29.655,28.253 32.068,29.218
  rectangle net GND: 33.338,25.179 35.04,31.25
  rectangle net 3.3V: 35.294,29.116 36.373,32.012
  rectangle net 3.3V: 35.294,31.707 40.755,33.333
  rectangle net GND: 33.947,36.05 35.04,39.446
  rectangle net GND: 34.354,30.988 35.04,37.955
  rectangle net V_SYS##: 35.268,34.222 36.424,38.209
  rectangle net V_SYS##: 37.351,39.624 44.819,40.953
  rectangle net V_SYS#: 43.703,57.582 48.199,60.731
  rectangle net GND: 46.33,30.412 48.634,32.741
  rectangle net BATT: 43.764,28.659 45.53,35.796
  rectangle net V_SYS: 46.647,36.762 47.308,37.651
  rectangle net V_SYS: 46.647,36.932 49.772,38.608
  rectangle net V_SYS: 41.034,36.762 47.308,37.066
  rectangle net V_SYS: 39.98,36.297 41.046,37.186
  rectangle net ST_LM: 42.558,34.755 43.472,36.584
  rectangle net GND: 33.338,25.179 42.583,28.253
  rectangle net GND: 36.868,21.387 37.935,28.253
  rectangle net GND: 47.536,27.872 50.635,32.741
  rectangle net BATT: 41.034,28.6 47.155,30.208
  rectangle net GND: 42.279,21.26 50.635,28.253
  rectangle net 5V: 37.363,13.902 43.218,16.662
  rectangle net 5V#: 43.917,13.233 50.508,16.416
  rectangle net 3.3V: 12.662,52.045 13.513,54.135
  rectangle net LCK: 16.752,40.699 17.285,42.604
  rectangle net SLK: 12.942,44.102 15.126,45.017
  rectangle net AGND: 13.932,46.49 16.904,48.217
  rectangle net 3.3V##: 16.706,45.347 18.149,46.033
  rectangle net 3.3V##: 13.894,45.347 16.904,46.312
  rectangle net GND: 30.239,51.511 38.659,53.043
  rectangle net LEDK: 30.976,55.177 31.738,56.574
  rectangle net LEDA: 38.202,58.801 39.385,60.96
  rectangle net NetD3_2: 40.274,57.658 43.195,60.96
  rectangle net LEDA: 36.525,56.66 38.496,60.96
  rectangle net 3.3V: 30.239,53.297 32.017,54.059
Bottom Layer:
  rectangle net GND: 1.88,10.262 7.722,13.208
  rectangle net V_SYS#: 30.671,17.856 32.461,19.177
  region net 5V: 38.178,31.429 37.008,31.429 37.008,28.787 38.178,28.787
  region net BATT: 48.171,20.866 49.098,21.793 44.552,26.34 43.624,25.413
  region net BATT: 49.098,21.844 48.082,21.844 48.082,11.481 49.098,11.481
  rectangle net BATT: 43.637,25.298 44.798,37.422
  region net GND: 39.065,52.73 39.065,46.863 44.933,46.863 44.933,52.73
  rectangle net GND: -2.591,11.557 10.389,16.408
  region net 5V: 43.256,14.262 40.157,14.262 40.157,6.731 43.256,6.731
  region net GND: 39.014,13.525 35.458,13.525 35.458,11.836 39.014,11.836
  rectangle net GND: 27.026,3.912 37.033,5.613
  rectangle net GND: 28.448,21.844 34.874,23.444
  rectangle net 5V#: 43.967,12.548 47.854,17.094
  rectangle net AGND: 15.926,37.998 17.043,41.148
  rectangle net 5V: 37.389,13.792 43.256,16.586
  rectangle net GND: 34.519,54.762 40.081,62.687
  rectangle net GND: 30.239,51.511 33.071,53.043
  rectangle net V_SYS#: 44.628,58.141 49.987,60.757
  rectangle net GND: 34.519,51.511 48.184,57.633
  rectangle net GND: 0.102,-9.881 15.926,-9.042
  rectangle net AGND: 14.503,39.141 16.612,47.168
  rectangle net AGND: 22.911,3.792 24.473,7.45

## Silkscreen, mask and mechanical layers (free items; w line width, h text height)
Top Overlay:
  lines w0.203: 2.819,49.047 2.819,49.403 3.023,49.606 3.023,50.343
  lines w0.254: 4.737,0.902 5.169,1.333 ; 5.944,55.016 5.944,54.813 6.121,54.635 ; 13.599,5.852 13.386,6.066 13.386,9.418 13.831,9.863 ; 13.678,4.402 13.45,4.173 13.45,2.629 13.704,2.375 ; 22.517,41.638 22.517,42.05 22.758,42.291 24.765,42.291 24.79,42.266 24.816,42.266 25.095,41.986 25.095,41.631 25.07,41.605 ; 25.375,47.015 25.654,47.015 26.067,47.428 ; 25.597,48.559 26.02,48.982 ; 28.118,45.72 28.169,45.72 28.321,45.872 28.575,45.872
  text "BOOT" at 5.102,61.376 h1.27
  text "#" at 7.874,58.561 h1.27
  text "*" at 44.89,56.413 h2.03 r270
  text "*" at 4.376,54.581 h2.03 r270
  text "#" at 46.624,54.091 h1.27
  text "*" at 12.885,53.997 h2.03 r270
  text "*" at 4.35,52.752 h2.03 r270
  text "*" at 29.623,52.219 h2.03 r270
  text "*" at 30.614,52.219 h2.03 r270
  text "#" at 11.853,52.129 h1.27
  text "CODEC_3V3" at 41.864,51.921 h1.27
  text "#" at 27.709,51.888 h1.27
  text "*" at 24.238,50.695 h2.03 r270
  text "*" at 24.213,49.653 h2.03 r270
  text "PWR_EN" at 43.251,49.458 h1.27
  text "P11" at 35.331,48.63 h1.27
  text "*" at 2.675,48.184 h2.03 r270
  text "V_SYS##" at 43.277,46.943 h1.27
  text "*" at 26.88,46.885 h2.03 r270
  text "P13" at 35.281,45.988 h1.27
  text "*" at 15.526,45.31 h2.03 r270
  text "*" at 22.33,44.673 h2.03 r270
  text "*" at 28.582,44.649 h2.03 r270
  text "P9" at 4.775,42.991 h1.27
  text "P8" at 4.775,40.68 h1.27
  text "*" at 19.108,39.696 h2.03 r270
  text "*" at 32.85,36.881 h2.03 r270
  text "#" at 41.834,34.863 h1.27
  text "P10" at 28.764,33.655 h1.27 r90
  text "P12" at 31.177,33.655 h1.27 r90
  text "#" at 38.573,33.257 h1.27
  text "#" at 39.843,33.231 h1.27
  text "*" at 32.951,31.187 h2.03 r270
  text "#" at 28.461,29.537 h1.27
  text "*" at 19.184,22.907 h2.03 r270
  text "*" at 26.767,20.887 h2.03 r270
  text "*" at 32.951,16.786 h2.03 r270
  text "*" at -5.072,16.662 h2.03 r270
  text "POGO" at 48.546,14.041 h1.27 r90
  text "BATTERY" at 43.332,11.574 h1.27
  text "V_SYS" at 43.332,9.178 h1.27
  text "5V" at 43.345,6.796 h1.27
  text "*" at 2.472,6.223 h2.03 r270
  text "3V3" at 44.882,4.434 h1.27
  text "#" at 20.87,4.224 h1.27
  text "#" at 16.501,2.65 h1.27
  text "#" at -1.838,2.116 h1.27
  text "#" at 5.985,-0.424 h1.27
  text "*" at 0.947,-0.867 h2.03 r270
  text "RESET" at -3.413,-4.995 h1.27
  text "NOTE:" at 47.676,-5.029 h1.27 r90
  text "*>> 0.1uF 0402" at 49.243,-5.032 h1.27 r90
  text "# >> 10K 0603" at 50.8,-5.035 h1.27 r90
Bottom Overlay:
  drawing of 3075 lines, arcs and shapes, not listed
  text "ZERO CARBON FOOTPRINT" at 13.018,29.718 h0.97
Board Outline:
  pour cut-out: 15.873,-0.285 cw(c19,-0.285) 22.127,-0.285 cw(c19,-0.285)
  lines w0.254: -5,-5 0,-10 46,-10 51,-5 51,63 -5,63 -5,-5 ; -1.4,0 ccw(c0,0) 1.4,0 ccw(c0,0) -1.4,0 ; -1.4,45 cw(c0,45) 1.4,45 cw(c0,45) -1.4,45 ; 16,-0.285 cw(c19,-0.285) 22,-0.285 cw(c19,-0.285) 16,-0.285 ; 41.6,5 cw(c43,5) 44.4,5 cw(c43,5) 41.6,5 ; 41.6,45 cw(c43,45) 44.4,45 cw(c43,45) 41.6,45 ; 42,0 cw(c43,0) 44,0 cw(c43,0) 42,0 ; 47,45 ccw(c48,45) 49,45 ccw(c48,45) 47,45